# Altium PCB B-60-30-B.PcbDoc (part 3 of 3)
Units mm, origin at the board's own origin, x right, y up, seen from the top; angles counter-clockwise.
Board outline 70.1 x 39.1 mm, 6 copper layers (Top Layer, G1, S1, S2, G2, Bottom Layer), stack 2.011 mm thick; 241 components, 129 nets, 632 pads, 875 vias.
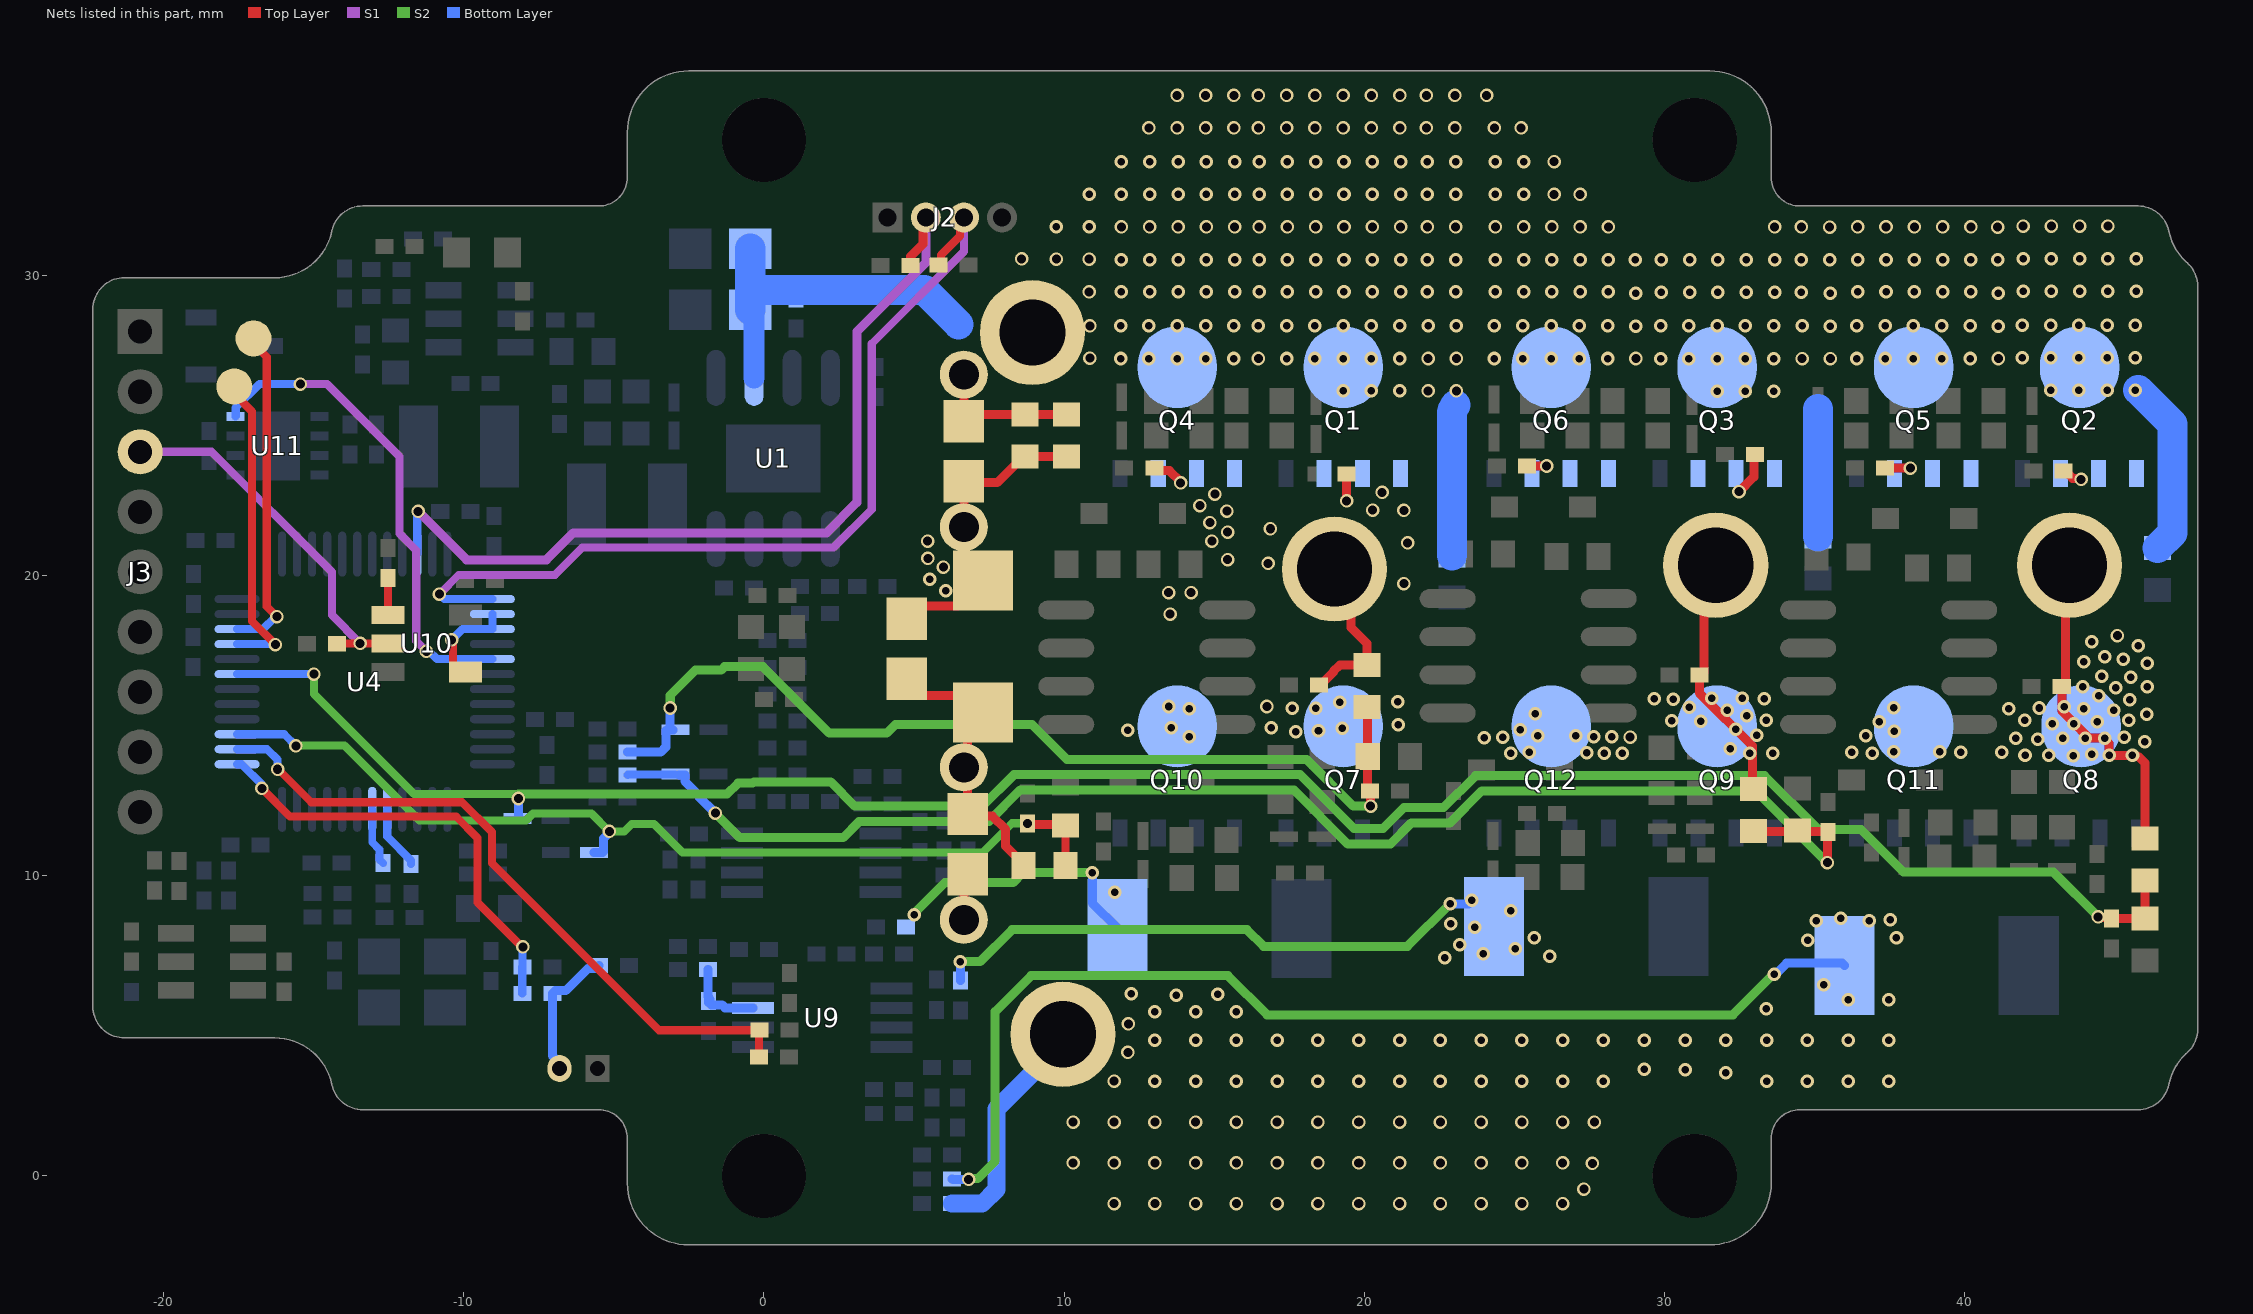
[diagram p7: the nets of this part, all layers, seen from the top]

## Via types
v1: diameter 0.45, hole 0.3, Top Layer to Bottom Layer, 450 vias
v2: diameter 0.45, hole 0.25, Top Layer to Bottom Layer, 425 vias

## Nets (pads, with @x,y where several pads share a name; then routed paths per layer and width w, separated by ;. In a path a pad name is that pad's centre, name@x,y a point inside that pad or via, vN(x,y) a via of type N, cw(c..) or ccw(c..) an arc to the next point about the centre after c; other vN are vias at no path point) (continued)
NetR83_2: R83.2 R89.1 U9.7 | length 2.7
  Bottom Layer w0.3: R89.1@-1.861,6.873 -1.857,6.869 -1.857,5.972 -1.853,5.968 -1.853,5.918 R83.2@-1.802,5.868 ; R83.2@-1.85,5.77 R83.2@-1.85,5.82 -1.85,5.792 -1.75,5.692 -1.392,5.692 -1.291,5.591 -0.36,5.591 U9.7@-0.357,5.588
NetR84_1: R84.1 U10.1 | length 1.2
  Top Layer w0.27: U10.1@-12.528,18.682 -12.52,18.69 R84.1@-12.52,19.91
OSCIN: R43.1 U4.5 | length 2.1
  Bottom Layer w0.27: U4.5@-12.545,12.207 -12.545,11.299 -11.75,10.504 R43.1@-11.75,10.39
OSCOUT: R51.1 U4.6 | length 1.9
  Bottom Layer w0.254: U4.6@-13.045,12.207 -13.045,11.108 -12.803,10.866 -12.803,10.533 R51.1@-12.68,10.41
OUTA: A.1 Q1.3 Q4.3 Q7.1 Q10.1 R19.1 R61.2 R99.2 R105.1 | length 7.6
  Top Layer w0.3: R99.2@13,23.57 13.08,23.49 13.506,23.49 13.877,23.118 v1(13.877,23.078) ; R19.1@18.49,16.35 18.54,16.35 18.968,16.778 18.968,16.798 19.18,17.01 20.03,17.01 R61.2@20.08,17.01 20.08,17.73 19.557,18.253 19.557,19.651 A.1@19,20.208 ; v1(19.41,22.48) R105.1@19.41,23.38 ; v1@20.561,22.79 v1(20.59,22.761)
  other v1: 16.75,15.63 13.53,18.71 13.48,19.42 14.23,19.42 21.31,19.72 16.79,20.4 15.44,20.52 21.44,21.08 14.92,21.14 15.44,21.44 16.87,21.55 14.85,21.75 15.42,22.14 20.27,22.17 21.31,22.16 14.52,22.32 15.02,22.7
  other v2: 14.17,14.62 17.72,14.79 18.47,14.82 12.11,14.84 19.26,14.9 13.56,14.92 16.89,14.93 21.12,15.03 14.17,15.55 17.59,15.57 18.38,15.57 13.48,15.63 19.17,15.77 21.11,15.79
OUTB: B.1 Q3.3 Q6.3 Q9.1 Q12.1 R36.1 R74.2 R101.2 R106.2 | length 10.6
  Top Layer w0.3: R101.2@25.41,23.64 v1(26.07,23.64) ; B.1@31.7,20.335 31.309,19.944 31.309,16.785 31.209,16.685 R36.1@31.159,16.685 31.159,16.078 32.93,14.307 32.93,12.91 R74.2@32.95,12.89 ; v1(32.475,22.783) 32.971,23.279 32.971,23.981 R106.2@33.01,24.02
  other v1: 28.85,14.61
  other v2: 24.88,14.07 27.98,14.07 28.58,14.07 27.4,14.09 32.83,14.08 33.6,14.08 25.49,14.1 32.19,14.23 23.99,14.59 24.6,14.61 27.64,14.63 28.23,14.62 25.77,14.65 27.04,14.66 33.06,14.68 25.19,14.85 32.36,14.88 31.2,15.14 30.23,15.16 33.38,15.18 32.73,15.33 25.69,15.39 32.08,15.51 30.82,15.61 30.29,15.87 29.65,15.89 31.56,15.9 33.31,15.89 32.58,15.91
OUTC: C.1 Q2.3 Q5.3 Q8.1 Q11.1 R53.1 R75.2 R100.2 R107.2 | length 12.8
  Top Layer w0.3: R100.2@37.33,23.58 38.172,23.58 v1(38.185,23.567) ; R107.2@43.28,23.48 43.33,23.48 43.586,23.224 43.839,23.224 v1(43.868,23.195) ; C.1@43.486,20.335 43.355,20.204 43.355,16.404 43.255,16.304 R53.1@43.224,16.304 43.224,15.486 43.64,15.07 v2@44.065,14.645 ; v2(44,14.58) 44.66,14.58 44.66,14.529 44.79,14.4 44.79,14.02 v2(44.81,14) 45.511,14 45.531,13.98 v2@45.56,13.98 ; v2(45.58,14) 45.609,13.971 45.768,13.971 45.99,13.749 R75.2@45.99,11.237
  other v1: 45.08,17.99
  other v2: 43.61,13.99 42,14.01 42.79,14.01 44.23,14.04 36.92,14.07 36.23,14.1 37.63,14.12 39.16,14.12 39.86,14.11 41.22,14.1 45.99,14.45 42.43,14.54 41.69,14.57 43.26,14.57 44.66,14.57 45.3,14.6 36.69,14.65 37.65,14.8 42.9,15.05 43.62,15.05 37.15,15.13 44.41,15.13 41.99,15.18 45.46,15.18 46.06,15.38 44.96,15.51 41.46,15.55 43.96,15.55 37.63,15.59 42.47,15.58 43.3,15.62 45.49,15.85 44.46,15.98 45.03,16.25 43.92,16.28 46.07,16.28 45.52,16.61 44.55,16.64 46.07,17.07 43.95,17.12 45.28,17.2 44.66,17.29 45.772,17.646 44.23,17.78
PG: C4.2 C5.2 C7.1 C8.1 C9.1 C10.2 C11.2 D26.1 R9.2 R70.1 R85.1 R86.1 Rs1.2 Rs2.2 Rs3.2 V-.1 | length 83.3
  Top Layer w0.3: C8.1@4.751,18.557 5.171,18.977 6.441,18.977 D26.1@7.291,19.827 6.656,20.462 C5.2@6.656,21.605 C9.1@6.656,23.129 6.7,23.085 7.77,23.085 8.638,23.953 C10.2@8.688,23.953 C11.2@10.085,23.953 ; C4.2@6.656,8.524 6.656,9.921 C7.1@6.783,10.048
  S2 w0.3: v2(5,8.69) 5,8.731 5.075,8.806 5.075,8.815 6.025,9.765 8.295,9.765 8.624,10.094 v2(10.935,10.094) ; v2(6.54,7.13) 7.196,7.13 8.266,8.2 16.084,8.2 16.646,7.638 21.428,7.638 v2(22.85,9.06) ; v1(6.82,-0.12) 6.849,-0.091 7.119,-0.091 7.7,0.49 7.7,5.47 8.9,6.67 15.45,6.67 16.76,5.36 32.27,5.36 v2@33.62,6.71 ; v2@23.539,9.17 v2(23.58,9.17) ; v2@35.249,6.36 v2(35.29,6.36)
  Bottom Layer w0.3: R85.1@6.27,-0.1 6.29,-0.12 v1(6.82,-0.12) ; R86.1@6.54,6.51 v2(6.54,7.13) ; v2(10.935,10.094) 10.935,9.082 Rs1.2@11.777,8.24 ; v2(22.85,9.06) 23.47,9.06 v2(23.58,9.17) ; v2(33.65,6.71) 33.691,6.71 34.061,7.08 35.913,7.08 Rs2.2@35.993,7
  Bottom Layer w0.6: R9.2@6.27,-0.93 7.27,-0.93 7.75,-0.45 7.75,2.23 V-.1@9.43,3.91
  other v1: 11.66,-0.925 13.018,-0.925 14.377,-0.925 15.735,-0.925 17.094,-0.925 18.452,-0.925 19.811,-0.925 21.169,-0.925 22.527,-0.925 23.886,-0.925 25.244,-0.925 26.603,-0.925 27.31,-0.44 10.302,0.433 11.66,0.433 13.018,0.433 14.377,0.433 15.735,0.433 17.094,0.433 18.452,0.433 19.811,0.433 21.169,0.433 22.527,0.433 23.886,0.433 25.244,0.433 26.603,0.433 27.59,0.41 10.302,1.792 11.66,1.792 13.018,1.792 14.377,1.792 15.735,1.792 17.094,1.792 18.452,1.792 19.811,1.792 21.169,1.792 22.527,1.792 23.886,1.792 25.244,1.792 26.603,1.792 27.66,1.79 11.66,3.15 12.12,4.11 12.14,5.06 5.98,20.27 5.46,20.56 5.45,21.14
  other v2: 13.018,3.15 14.377,3.15 15.735,3.15 17.094,3.15 18.452,3.15 19.811,3.15 21.169,3.15 22.527,3.15 23.886,3.15 25.244,3.15 26.603,3.15 27.961,3.15 33.395,3.15 34.753,3.15 36.112,3.15 37.47,3.15 32.04,3.44 29.32,3.55 30.68,3.54 13.018,4.508 14.377,4.508 15.735,4.508 17.094,4.508 18.452,4.508 19.811,4.508 21.169,4.508 22.527,4.508 23.886,4.508 25.244,4.508 26.603,4.508 27.961,4.508 29.319,4.508 30.678,4.508 32.036,4.508 33.395,4.508 34.753,4.508 36.112,4.508 37.47,4.508 13.018,5.471 14.377,5.471 15.735,5.471 33.39,5.57 36.112,5.867 37.47,5.867 13.74,6.01 12.24,6.07 15.12,6.05 22.68,7.27 26.17,7.31 23.96,7.39 25.02,7.57 23.17,7.7 34.77,7.849 25.65,7.93 37.72,7.93 23.68,8.27 22.87,8.39 35.04,8.49 36.81,8.5 37.51,8.52 35.86,8.57 24.88,8.83 11.69,9.438 6.06,19.48 5.53,19.86
PWM: U4.38 U4.39 U10.4 | length 3.6
  Top Layer w0.27: v1(-10.4,17.85) -10.4,17.801 -10.355,17.756 -10.355,16.995 -10.14,16.78 U10.4@-9.94,16.78 ; U10.4@-9.94,16.63 U10.4@-9.74,16.63
  Bottom Layer w0.27: v1(-10.4,17.85) -10.043,18.207 U4.39@-9.045,18.207 U4.38@-9.045,18.707
PWM-IN: J3.3 R88.1 U10.2 | length 12.7
  Top Layer w0.27: J3.3@-20.776,24.113 J3.3@-20.593,24.113 ; R88.1@-14.22,17.732 v1(-13.45,17.732) U10.2@-12.528,17.732 U10.2@-12.516,17.744
  S1 w0.27: J3.3@-20.776,24.113 -18.393,24.113 -14.39,20.11 -14.39,18.672 v1(-13.45,17.732)
RX3: T2.1 U4.22 | length 11.1
  Top Layer w0.27: T2.1@-17,27.89 -17,27.707 -16.56,27.267 -16.56,18.96 v1(-16.22,18.62)
  Bottom Layer w0.27: U4.22@-17.545,18.207 -16.682,18.207 -16.269,18.62 v1(-16.22,18.62)
STB: U4.41 U11.8 | length 16.2
  S1 w0.27: v1(-15.44,26.37) -14.552,26.37 -12.136,23.954 -12.136,21.386 -11.58,20.83 -11.58,17.81 v1(-11.24,17.47)
  Bottom Layer w0.27: U11.8@-17.601,25.288 -17.59,25.299 -17.59,25.58 -16.8,26.37 v1(-15.44,26.37) ; v1(-11.24,17.47) -11.15,17.47 -10.887,17.207 U4.41@-9.045,17.207
SWC: J2.3 R59.1 U4.37 | length 30.4
  Top Layer w0.27: R59.1@5.73,30.33 5.78,30.33 5.895,30.445 5.895,30.665 6.535,31.305 6.535,31.795 J2.3@6.66,31.92
  S1 w0.27: v1(-10.81,19.37) -10.164,20.016 -6.954,20.016 -6.05,20.92 2.32,20.92 3.59,22.19 3.59,27.71 6.66,30.78 J2.3@6.66,31.92
  Bottom Layer w0.27: v1(-10.81,19.37) -10.647,19.207 U4.37@-9.045,19.207
SWD: J2.2 R55.1 U4.34 | length 29.8
  Top Layer w0.3: R55.1@4.88,30.32 4.88,30.616 5.29,31.026 5.29,31.82 J2.2@5.39,31.92
  S1 w0.3: v1(-11.52,22.13) -9.901,20.511 -7.249,20.511 -6.345,21.415 2.085,21.415 3.095,22.425 3.095,28.115 5.39,30.41 J2.2@5.39,31.92
  Bottom Layer w0.27: U4.34@-11.545,20.707 -11.545,22.105 v1(-11.52,22.13)
Temp-M: J4.2 R63.2 R67.1 | length 4.5
  Bottom Layer w0.3: J4.2@-6.806,3.571 -6.806,3.756 -7.048,3.998 R67.1@-7.048,6.067 -6.948,6.167 -6.601,6.167 -5.858,6.91 -5.59,6.91 R63.2@-5.49,7.01
Temp-MOS: C46.2 R66.2 U4.14 | length 22.9
  Top Layer w0.27: v1(-16.2,13.54) -16.177,13.54 -15.077,12.44 -10.05,12.44 -9.06,11.45 -9.06,10.41 -3.499,4.849 -0.162,4.849 -0.158,4.845 -0.158,3.964 C46.2@-0.162,3.96
  Bottom Layer w0.27: U4.14@-17.545,14.207 -16.548,14.207 -16.2,13.859 v1(-16.2,13.54)
Temp-Motor: C47.2 R67.2 U4.13 | length 14.9
  Top Layer w0.27: v1(-16.72,12.9) -15.78,11.96 -10.249,11.96 -9.54,11.251 -9.54,9.103 -8.063,7.626 v1(-8.03,7.626)
  Bottom Layer w0.27: U4.13@-17.545,13.707 -17.397,13.707 -16.72,13.03 v1(-16.72,12.9) ; R67.2@-8.048,6.067 C47.2@-8.048,6.956 ; C47.2@-8.039,6.956 -8.039,7.617 v1(-8.03,7.626)
TX3: T1.1 U4.21 | length 10.4
  Top Layer w0.27: T1.1@-17.64,26.29 -17.64,26.049 -17.05,25.459 -17.05,18.47 v1(-16.27,17.69)
  Bottom Layer w0.27: U4.21@-17.545,17.707 -16.287,17.707 v1(-16.27,17.69)
V+: C4.1 C5.1 C7.2 C8.2 C9.2 C10.1 C11.1 C12.2 C14.2 C30.1 C32.1 C34.1 D26.2 Q1.1 Q2.1 Q3.1 Q4.1 Q5.1 Q6.1 R5.1 R60.2 U1.2 V+.1 | length 42.5
  Top Layer w0.3: C8.2@4.578,16.73 C8.2@4.751,16.557 4.751,16.527 5.276,16.002 6.716,16.002 D26.2@7.291,15.427 6.783,14.919 C7.2@6.783,12.048 ; C5.1@6.656,26.685 C9.2@6.656,25.129 6.88,25.353 C10.1@8.688,25.353 C11.1@10.085,25.353 ; C7.2@7.308,11.493 6.783,12.018 C7.2@6.783,12.048 ; R60.2@8.646,10.335 8.646,10.385 8.05,10.981 8.05,11.54 7.61,11.98 6.851,11.98 C7.2@6.783,12.048 ; R60.2@8.766,10.635 R60.2@8.816,10.635
  Bottom Layer w0.7: C14.2@-0.456,28.844 -0.329,28.717 U1.2@-0.329,26.574 ; C14.2@-0.456,29.37 C14.2@-0.303,29.217
  Bottom Layer w1: C14.2@-0.456,28.844 -0.456,29.37 C12.2@-0.456,30.876 ; C14.2@-0.06,29.5 5.34,29.5 6.48,28.36 ; C30.1@22.912,20.654 22.912,25.362 cw(c23.346,25.362) 23.039,25.669 ; C34.1@35.104,21.289 35.104,25.542 ; v2@45.772,26.177 46.915,25.034 46.915,21.416 C32.1@46.407,20.908
  other v1: 22.12,26.14 23.062,26.14 10.854,27.23 16.465,27.22 22.12,27.22 23.062,27.22 29.044,27.22 34.575,27.216 35.518,27.216 41.114,27.22 10.854,28.31 10.827,29.437 9.737,30.527 10.827,30.527 8.58,30.54 35.491,31.593 41.087,31.597 11.907,31.607 12.849,31.607 13.792,31.607 14.734,31.607 15.677,31.607 16.492,31.607 17.434,31.607 18.377,31.607 19.319,31.607 20.262,31.607 21.204,31.607 22.093,31.607 23.035,31.607 24.358,31.607 25.301,31.607 26.243,31.607 27.186,31.607 28.128,31.607 33.66,31.603 34.548,31.603 36.428,31.607 37.371,31.607 38.313,31.607 39.256,31.607 40.198,31.607 41.935,31.627 42.878,31.627 43.82,31.627 44.763,31.627 26.32,32.69 27.186,32.687 26.32,33.78 25.22,34.9 12.822,34.904 13.765,34.904 14.707,34.904 15.65,34.904 16.465,34.904 17.407,34.904 18.35,34.904 19.292,34.904 20.235,34.904 21.177,34.904 22.066,34.904 23.008,34.904 24.331,34.904 13.765,35.984 14.707,35.984 15.65,35.984 16.465,35.984 17.407,35.984 18.35,35.984 19.292,35.984 20.235,35.984 21.177,35.984 22.066,35.984 23.008,35.984 24.07,35.98
  other v2: 31.748,26.136 32.69,26.136 33.633,26.136 19.292,26.14 20.235,26.14 21.177,26.14 42.851,26.16 43.793,26.16 44.736,26.16 45.678,26.16 11.88,27.22 12.822,27.22 13.765,27.22 14.707,27.22 15.65,27.22 17.407,27.22 18.35,27.22 19.292,27.22 20.235,27.22 21.177,27.22 24.331,27.22 25.274,27.22 26.216,27.22 27.159,27.22 28.101,27.22 29.863,27.216 30.805,27.216 31.748,27.216 32.69,27.216 33.633,27.216 36.401,27.22 37.344,27.22 38.286,27.22 39.229,27.22 40.171,27.22 41.908,27.24 42.851,27.24 43.793,27.24 44.736,27.24 45.678,27.24 35.518,28.296 11.88,28.31 12.822,28.31 13.765,28.31 14.707,28.31 15.65,28.31 16.465,28.31 17.407,28.31 18.35,28.31 19.292,28.31 20.235,28.31 21.177,28.31 22.12,28.31 23.062,28.31 24.331,28.31 25.274,28.31 26.216,28.31 27.159,28.31 28.101,28.31 29.044,28.3 29.863,28.306 30.805,28.306 31.748,28.306 32.69,28.306 33.633,28.306 34.575,28.306 36.401,28.31 37.344,28.31 38.286,28.31 39.229,28.31 40.171,28.31 41.114,28.3 41.908,28.33 42.851,28.33 43.793,28.33 44.736,28.33 45.678,28.33 35.518,29.386 29.044,29.39 41.114,29.39 11.907,29.437 12.849,29.437 13.792,29.437 14.734,29.437 15.677,29.437 16.492,29.437 17.434,29.437 18.377,29.437 19.319,29.437 20.262,29.437 21.204,29.437 22.093,29.437 23.035,29.437 24.358,29.437 25.301,29.437 26.243,29.437 27.186,29.437 28.128,29.437 29.89,29.433 30.832,29.433 31.775,29.433 32.717,29.433 33.66,29.433 34.548,29.433 36.428,29.437 37.371,29.437 38.313,29.437 39.256,29.437 40.198,29.437 41.935,29.457 42.878,29.457 43.82,29.457 44.763,29.457 45.705,29.457 11.907,30.517 12.849,30.517 13.792,30.517 14.734,30.517 15.677,30.517 16.492,30.517 17.434,30.517 18.377,30.517 19.319,30.517 20.262,30.517 21.204,30.517 22.093,30.517 23.035,30.517 24.358,30.517 25.301,30.517 26.243,30.517 27.186,30.517 28.128,30.517 29.017,30.517 29.89,30.513 30.832,30.513 31.775,30.513 32.717,30.513 33.66,30.513 34.548,30.513 35.491,30.513 36.428,30.517 37.371,30.517 38.313,30.517 39.256,30.517 40.198,30.517 41.087,30.517 41.935,30.537 42.878,30.537 43.82,30.537 44.763,30.537 45.705,30.537 9.737,31.607 10.827,31.607 10.827,32.687 11.907,32.687 12.849,32.687 13.792,32.687 14.734,32.687 15.677,32.687 16.492,32.687 17.434,32.687 18.377,32.687 19.319,32.687 20.262,32.687 21.204,32.687 22.093,32.687 23.035,32.687 24.358,32.687 25.301,32.687 11.907,33.777 12.849,33.777 13.792,33.777 14.734,33.777 15.677,33.777 16.492,33.777 17.434,33.777 18.377,33.777 19.319,33.777 20.262,33.777 21.204,33.777 22.093,33.777 23.035,33.777 24.358,33.777 25.301,33.777
V-A: C44.2 D22.1 R13.2 R61.1 R65.2 | length 32.5
  Top Layer w0.3: R61.1@20.08,15.61 20.11,15.58 R65.2@20.11,13.97 20.11,12.92 20.205,12.825 20.2,12.82 20.2,12.321 v1(20.21,12.311)
  S2 w0.3: v1(-3.128,15.58) -3.12,15.588 -3.12,16 -2.28,16.84 -1.425,16.84 -1.306,16.959 -0.039,16.959 2.18,14.74 4.09,14.74 4.38,15.03 8.93,15.03 10.09,13.87 18.07,13.87 19.629,12.311 v1(20.21,12.311)
  Bottom Layer w0.3: R13.2@-4.536,14.112 -3.438,14.112 -3.262,14.289 -3.262,14.825 -3.232,14.855 D22.1@-3.03,14.855 ; v1(-3.128,15.58) -3.128,14.885 -3.098,14.855 D22.1@-3.09,14.855
V-B: C52.2 D23.1 R21.2 R74.1 R78.2 | length 47.5
  Top Layer w0.3: R74.1@32.95,11.49 32.97,11.47 35.42,11.47 C52.2@35.44,11.45 35.46,11.43 35.42,11.39 v1(35.42,10.43)
  S2 w0.3: v1(-1.62,12.081) -0.804,11.265 2.635,11.265 3.17,11.8 7.49,11.8 8.54,12.85 17.648,12.85 19.448,11.05 20.867,11.05 21.567,11.75 22.841,11.75 23.911,12.82 33.03,12.82 v1(35.42,10.43)
  Bottom Layer w0.27: R21.2@-4.536,13.35 -4.521,13.365 D23.1@-2.965,13.365
  Bottom Layer w0.3: D23.1@-2.826,13.35 -2.635,13.35 -2.635,13.145 -2.18,12.69 -2.18,12.643 v1(-1.62,12.081) v1(-1.62,12.081)
V-BUS: C43.2 D21.1 R60.1 R64.2 U4.15 | length 32.3
  Top Layer w0.27: R64.2@10.046,11.667 10.046,10.584 R60.1@10.05,10.58
  Top Layer w0.3: R64.2@10.046,11.667 10.009,11.703 C43.2@8.813,11.703 ; C43.2@8.813,11.703 v1(8.776,11.74) C43.2@8.813,11.703
  S2 w0.27: v1(-15.59,14.32) -15.576,14.334 -13.974,14.334 -11.47,11.83 -7.926,11.83 -7.691,12.065 -5.745,12.065 v1(-5.15,11.47) -4.652,11.47 -4.402,11.72 -3.66,11.72 -2.71,10.77 7.289,10.77 8.26,11.74 v1(8.776,11.74)
  Bottom Layer w0.27: U4.15@-17.545,14.707 -15.977,14.707 v1(-15.59,14.32)
  Bottom Layer w0.3: D21.1@-5.655,10.772 -5.37,10.772 -5.348,10.794 -5.348,11.231 -5.15,11.429 v1(-5.15,11.47)
V-C: C53.2 D24.1 R75.1 R79.2 U4.19 | length 72.1
  Top Layer w0.3: v1(44.439,8.62) 44.464,8.595 44.855,8.595 C53.2@44.88,8.57 ; C53.2@44.88,8.57 R79.2@45.99,8.57 R75.1@45.99,9.837
  S2 w0.27: v1(-14.99,16.71) -14.99,16.05 -11.65,12.71 v1@-8.18,12.71
  S2 w0.3: v1(-8.18,12.566) -8.18,12.71 -1.232,12.71 -0.862,13.08 -0.378,13.08 -0.338,13.12 2.219,13.12 3.029,12.31 7.279,12.31 8.329,13.36 17.859,13.36 19.659,11.56 20.614,11.56 21.314,12.26 22.63,12.26 23.7,13.33 33.32,13.33 35.11,11.54 36.53,11.54 37.96,10.11 42.949,10.11 v1(44.439,8.62)
  Bottom Layer w0.27: U4.19@-17.545,16.707 -16.005,16.707 -15.998,16.714 -14.994,16.714 v1(-14.99,16.71)
  Bottom Layer w0.3: D24.1@-8.21,11.9 -8.18,11.93 v1(-8.18,12.566)
pads on no net: U1.6 U4.2 U4.3 U4.4 U4.25 U4.32 U4.33 U4.42 U4.43 U11.5 U11.9 U12.4

## Polygon pours and split planes (outlines as drawn)
GND on Bottom Layer "GND_L06_P111" (solid, pour order 111): 30 vertices, not listed, extent -21.85,2.9 4.12,32.16
PG on Bottom Layer "PG_L06_P114" (solid, pour order 114): 17 vertices, not listed, extent 5.16,8.02 11.327,22.71
CA on Bottom Layer "CA_L06_P119" (solid, pour order 119): 22 vertices, not listed, extent 12.63,6.61 22.59,12.6
CB on Bottom Layer "Bottom Layer-CB" (solid, pour order 71): 22 vertices, not listed, extent 24.949,6.629 35.079,12.632
V+ on Bottom Layer "Bottom Layer-V+" (solid, pour order 28): 21 vertices, not listed, extent 5.513,24.78 47.042,32.733
3V3 on Bottom Layer "3V3_L06_P108" (solid, pour order 108): -11,10.95 -11.2,10.75 -11.2,9.27 -10.57,8.64 -10.119,8.64 -9.854,8.905 -9.854,10.76 -10.044,10.95
GND on Bottom Layer "GND_L06_P106" (solid, pour order 106): 5.259,-0.941 4.368,-0.05 3.85,-0.05 3.47,-0.43 3.47,-1.57 3.77,-1.87 5.83,-1.87 6,-1.7 6,-1.48 5.461,-0.941
AGND on Bottom Layer "AGND_L06_P099" (solid, pour order 99): 2.29,14.74 3.71,14.74 5,13.45 5,3.93 4.33,3.26 -1.594,3.26 -2.114,2.74 -6.92,2.74 -7.44,3.26 -7.44,6.45 -7.44,7.89 -1.86,13.47 1.02,13.47 2.25,14.7
PG on Bottom Layer "Bottom Layer-PG" (solid, pour order 20): 36 vertices, not listed, extent 7.97,-1.086 38.56,9.51
V+ on Bottom Layer "Bottom Layer-V+ 1" (solid, pour order 86): 8.69,30.73 13.24,36.36 24.63,36.36 30.26,30.73
CC on Bottom Layer "Bottom Layer-CC" (solid, pour order 30): 55 vertices, not listed, extent 37,4.587 47.56,19.98
OUTC on Bottom Layer "Bottom Layer-OUTC" (solid, pour order 26): 17 vertices, not listed, extent 35.495,13.096 46.28,24.145
OUTB on Bottom Layer "Bottom Layer-OUTB" (solid, remove dead copper, pour order 24): 34.093,24.145 cw(c34.093,23.764) 34.474,23.764 34.474,13.731 cw(c33.447,14.044) 33.951,13.096 24.014,13.096 cw(c25.436,14.518) 23.425,14.518 23.425,19.664 cw(c25.965,19.664) 24.169,21.46 24.822,22.113 ccw(c24.209,22.726) 25.076,22.726 25.076,23.701 cw(c25.518,23.609) 25.266,23.983 cw(c25.724,23.424) 25.775,24.145
OUTA on Bottom Layer "Bottom Layer-OUTA" (solid, pour order 22): 21.642,24.145 cw(c21.642,23.764) 22.023,23.764 22.023,13.731 cw(c20.995,14.045) 21.5,13.096 11.563,13.096 cw(c12.985,14.518) 10.974,14.518 10.974,19.664 cw(c13.514,19.664) 11.718,21.46 12.371,22.113 ccw(c11.758,22.726) 12.625,22.726 12.625,23.711 cw(c13.059,23.711) 12.752,24.018 cw(c13.059,23.711) 13.059,24.145
CA on Top Layer "CA_L01_P135" (solid, pour order 135): 19.91,11.55 22,11.55 22.34,11.21 22.34,9.98 21.16,8.8 21.16,6.89 20.96,6.69 17.5,6.69 17.23,6.96 17.23,8.96 18.35,10.08
CB on Top Layer "CB_L01_P134" (solid, pour order 134): 25 vertices, not listed, extent 26.38,7.08 34.51,12.55
CC on Top Layer "CC_L01_P133" (solid, pour order 133): 20 vertices, not listed, extent 38.77,4.28 46.67,9.6
OUTA on Top Layer "OUTA_L01_P132" (solid, pour order 132): 21 vertices, not listed, extent 16.64,14.71 22.08,22.93
OUTB on Top Layer "OUTB_L01_P131" (solid, pour order 131): 26 vertices, not listed, extent 29.35,13.6 33.84,22.04
OUTC on Top Layer "OUTC_L01_P130" (solid, pour order 130): 42.96,22.19 45.17,22.19 47.1,20.26 47.1,14.8 46.06,13.76 41.46,13.76 41.46,15.66 42.55,15.66 43.11,16.22 43.11,16.73 42.07,17.77 42.07,19.53 41.57,20.03 41.57,21.48 42.24,22.15
PG on Top Layer "PG_L01_P122" (solid, pour order 122): 43 vertices, not listed, extent 5.65,-1.57 38.31,10.048
GND on Top Layer "GND_L01_P110" (solid, pour order 110): 30 vertices, not listed, extent -21.85,2.9 4.12,32.16
GND on Top Layer "GND_L01_P107" (solid, pour order 107): 3.48,1.98 3.48,-1.58 3.99,-2.09 5.94,-2.09 6.31,-1.72 6.31,-1.02 5.13,0.16 5.13,2.55 3.19,4.49 1.949,4.49 1.459,4.001 1.631,3.829
AGND on Top Layer "AGND_L01_P104" (solid, pour order 104): 0.94,16.88 2.86,14.96 3.51,14.96 4.44,14.03 4.44,13.37 3.41,12.34 3.41,5.49 1.55,3.63 -1.14,3.63 -1.95,2.82 -6.01,2.82 -7.38,4.19 -7.38,7.91 0.57,15.86 0.57,16.91
V+ on Top Layer "V+_L01_P102" (solid, pour order 102): 67 vertices, not listed, extent 5.04,24.39 47.58,34.18
V+ on Top Layer "Top Layer-V+ 1" (solid, pour order 88): 6.45,28.86 13.88,36.29 24.21,36.29 31.64,28.86
PG on Top Layer "Top Layer-PG 1" (solid, pour order 36): 19 vertices, not listed, extent 4.11,17.99 8.66,23.836
PG on S1 "PG_L03_P103" (solid, pour order 103): 36 vertices, not listed, extent 3.76,-1.6 38.03,22.85
CA on S1 "CA_L03_P121" (solid, pour order 121): 17.27,6.69 17.82,6.14 21.11,6.14 21.72,6.75 21.72,9.242 22.091,9.614 17.574,9.614 17.27,9.31
CC on S1 "S1-CC" (solid, pour order 76): 28 vertices, not listed, extent 37.06,4.57 47.43,12.31
CA on S1 "CA_L03_P118" (solid, pour order 118): 21 vertices, not listed, extent 12.47,8.22 22.493,12.62
CB on S1 "CB_L03_P116" (solid, pour order 116): 24 vertices, not listed, extent 26.25,6.97 34.5,12.6
GND on S1 "GND_L03_P113" (solid, pour order 113): 28 vertices, not listed, extent -21.77,-1.8 6.9,32.17
V+ on S1 "S1-V+" (solid, pour order 98): 22 vertices, not listed, extent 5.32,12.7 47.27,36.28
OUTC on S1 "S1-OUTC" (solid, pour order 66): 37.436,24.217 45.956,24.217 cw(c45.956,23.637) 46.366,24.047 cw(c46.028,23.709) 46.506,23.709 46.506,14.026 cw(c45.857,14.026) 46.316,13.567 46.044,13.295 cw(c45.856,13.483) 45.856,13.217 36.006,13.217 cw(c36.006,13.627) 35.716,13.337 cw(c36.32,13.941) 35.466,13.941 35.466,22.308 cw(c37.515,22.308) 36.066,23.757 cw(c37.225,22.598) 37.225,24.237 37.436,24.237
OUTB on S1 "S1-OUTB" (solid, pour order 64): 25.65,24.217 34.17,24.217 cw(c34.17,23.637) 34.58,24.047 cw(c34.242,23.709) 34.72,23.709 34.72,14.026 cw(c34.071,14.026) 34.53,13.567 34.258,13.295 cw(c34.07,13.483) 34.07,13.217 24.22,13.217 cw(c24.22,13.627) 23.93,13.337 cw(c24.534,13.941) 23.68,13.941 23.68,22.308 cw(c25.729,22.308) 24.28,23.757 cw(c25.439,22.598) 25.439,24.237 25.65,24.237
OUTA on S1 "S1-OUTA" (solid, pour order 62): 12.95,24.09 21.47,24.09 cw(c21.47,23.51) 21.88,23.92 cw(c21.542,23.582) 22.02,23.582 22.02,13.899 cw(c21.371,13.899) 21.83,13.44 21.558,13.168 cw(c21.37,13.356) 21.37,13.09 11.52,13.09 cw(c11.52,13.5) 11.23,13.21 cw(c11.834,13.814) 10.98,13.814 10.98,22.181 cw(c13.029,22.181) 11.58,23.63 cw(c12.739,22.471) 12.739,24.11 12.95,24.11
OUTA on S2 "OUTA_L04_P129" (solid, pour order 129): 13.785,23.395 20.665,23.395 21.86,22.2 21.86,19.73 21.165,19.035 20.865,19.035 20.315,18.485 13.375,18.485 12.985,18.875 12.985,20.905 13.455,21.375 13.455,23.065
PG on S2 "PG_L04_P128" (solid, pour order 128): 5.53,22.55 7.48,22.55 8.98,21.05 8.98,19.71 8.43,19.16 5.1,19.16 4.42,19.84 4.42,21.44
PG on S2 "PG_L04_P127" (solid, pour order 127): 17 vertices, not listed, extent 8.18,-1.57 37.98,6.75
OUTC on S2 "OUTC_L04_P126" (solid, pour order 126): 42.67,22.35 45.06,22.35 46.78,20.63 46.78,14.36 45.95,13.53 45.9,13.58 36.249,13.58 35.85,13.979 35.85,15.53
OUTB on S2 "OUTB_L04_P125" (solid, pour order 125): 24.33,16.16 33.51,16.16 34.32,15.35 34.32,14.1 33.98,13.76 24.15,13.76 23.54,14.37 23.54,15.37
OUTA on S2 "OUTA_L04_P124" (solid, pour order 124): 12.21,16.18 21.39,16.18 22.02,15.55 22.02,14.5 21.61,14.09 18.65,14.09 18.38,14.36 11.89,14.36 11.54,14.71 11.54,15.51
V+ on S2 "V+_L04_P123" (solid, pour order 123): 17 vertices, not listed, extent 5.52,24.88 46.83,36.18
CC on S2 "S1-CC" (solid, pour order 120): 25 vertices, not listed, extent 37.06,4.57 47.43,12.31
CA on S2 "CA_L04_P117" (solid, pour order 117): 21 vertices, not listed, extent 12.47,8.22 22.493,12.62
CB on S2 "CB_L04_P115" (solid, pour order 115): 24 vertices, not listed, extent 26.25,6.97 34.5,12.6
GND on S2 "GND_L04_P105" (solid, remove dead copper, pour order 105): 28 vertices, not listed, extent -21.77,-1.8 6.9,32.17
AGND on G1 (split plane): 57 vertices, not listed, extent -7.538,-1.791 7.038,15.318
PG on G1 (split plane): 118 vertices, not listed, extent 5.882,-1.791 47.24,9.618
GND on G1 (split plane): 168 vertices, not listed, extent -21.841,2.709 4.878,36.291
V+ on G1 (split plane): 100 vertices, not listed, extent 5.882,10.622 47.24,36.291
no net on G1 (split plane): 47.04,4.46
OUTC on G1 (split plane): 47.24,10.622 37.399,10.622 37.398,10.623 37.3,10.632 35.998,10.632 36.002,10.68 36.002,23.058 47.24,23.058
OUTA on G1 (split plane): 22.238,10.622 13.962,10.622 13.962,18.802 18.218,23.058 22.238,23.058
OUTB on G1 (split plane): 34.998,10.68 35.003,10.622 23.242,10.622 23.242,23.058 34.998,23.058
GND on G2 (split plane): 210 vertices, not listed, extent -21.841,-1.791 7.078,36.291
V+ on G2 (split plane): 97 vertices, not listed, extent 5.882,10.482 47.24,36.291
PG on G2 (split plane): 131 vertices, not listed, extent 5.882,-1.791 47.24,9.478
OUTB on G2 (split plane): 35.928,10.512 35.21,10.512 35.112,10.503 35.045,10.482 24.862,10.482 24.862,23.058 35.928,23.058
no net on G2 (split plane): 47.04,4.46
OUTA on G2 (split plane): 23.858,10.482 11.172,10.482 11.172,22.702 11.528,23.058 23.858,23.058
OUTC on G2 (split plane): 47.24,10.482 36.932,10.482 36.932,23.058 47.24,23.058

## Other copper
Top Layer:
  rectangle net GND: 24.02,20.245 25.11,21.56
S2:
  rectangle net GND: -1.23,22.73 2.12,25.14
Bottom Layer:
  rectangle net CC: 38.88,6.71 40.445,7.704
G1 (plane layer: these items are gaps in the copper):
  rectangle: -13.94,31.25 -13.87,31.51
  rectangle: 3.17,15.93 3.87,17.17
  lines w1: -8.04,2.21 -8.04,8.44 -0.66,15.82 5.38,15.82 ; 5.37,10.12 13.46,10.12 ; 5.38,10.12 5.38,7.64 ; 5.38,36.8 5.38,7.64 ; 7.54,-2.11 7.54,5.48 ; 22.74,10.28 22.74,23.55 ; 33.65,6.71 33.65,8.44 35.34,10.13 37.3,10.13 ; 35.5,10.68 35.5,23.55 ; 47.62,10.12 13.46,10.12 ; 47.8,23.56 18.01,23.56 13.46,19.01 13.46,10.12 ; 5.38,7.64 7.54,5.48 ; 5.38,7.64 7.54,5.48
  lines w1.016: -14.39,31.463 cw(c-14.341,31.453) -14.39,31.463 ; -14.39,31.463 ccw(c-16.3,31.861) -14.39,31.463 ; -14.39,31.463 cw(c-16.3,31.861) -16.3,29.91 -21.3,29.91 ccw(c-21.3,28.86) -22.35,28.86 -22.35,5.644 ccw(c-21.3,5.644) -21.3,4.593 -16.3,4.593 cw(c-16.3,2.642) -14.39,3.041 ccw(c-14.341,3.051) -14.388,3.032 ; -14.39,31.463 -14.39,31.463 ; -14.39,31.463 -14.39,31.463 ; -14.39,31.463 cw(c-13.363,31.251) -13.362,32.3 -5.504,32.3 cw(c-5.5,32.25) -5.5,32.3 ccw(c-5.5,33.25) -4.55,33.25 -4.55,34.75 cw(c-2.5,34.75) -2.5,36.8 ; -14.39,31.463 -14.39,31.463 ; -14.388,3.032 ccw(c-13.362,3.248) -13.36,2.199 ccw(c-13.36,2.25) -13.356,2.2 -5.5,2.2 cw(c-5.5,1.25) -4.55,1.25 -4.55,-0.25 ccw(c-2.5,-0.25) -2.5,-2.3 ; -14.388,3.032 -14.388,3.032 ; -2.5,-2.3 ccw(c-2.5,-2.25) -2.499,-2.3 ; -2.499,-2.3 31.5,-2.3 ccw(c31.5,-0.25) 33.55,-0.25 33.55,1.25 cw(c34.5,1.25) 34.5,2.2 45.756,2.2 ccw(c45.76,2.25) 45.76,2.199 ccw(c45.762,3.248) 46.789,3.04 ; -2.499,36.8 ccw(c-2.5,36.75) -2.5,36.8 ; -2.499,36.8 31.5,36.8 cw(c31.5,34.75) 33.55,34.75 33.55,33.25 ccw(c34.5,33.25) 34.5,32.3 45.762,32.3 cw(c45.762,32.25) 45.766,32.3 cw(c45.763,31.251) 46.79,31.463 ; 46.789,3.04 cw(c48.7,2.649) 47.353,4.059 ccw(c47.328,4.103) 47.36,4.064 ccw(c46.7,4.88) 47.749,4.87 ccw(c47.7,4.88) 47.75,4.88 47.75,29.628 ccw(c47.7,29.628) 47.749,29.638 ccw(c46.7,29.628) 47.36,30.444 ; 46.789,3.04 46.789,3.04 ; 46.79,31.463 ccw(c48.7,31.861) 47.358,30.445 ; 46.79,31.463 46.79,31.463 ; 47.358,30.445 cw(c47.328,30.405) 47.36,30.444 ; 47.358,30.445 47.358,30.445 ; 47.36,30.444 47.36,30.444
G2 (plane layer: these items are gaps in the copper):
  rectangle: -1.81,14.55 -1.02,15.43
  rectangle: -13.96,31.17 -13.8,31.6
  lines w1: 5.38,36.55 5.38,7.85 7.58,5.65 ; 5.39,7.13 6.54,7.13 ; 5.42,9.98 47.39,9.98 ; 5.47,7.76 7.58,5.65 ; 7.58,-2.12 7.58,5.65 ; 10.67,10.24 10.67,22.91 11.32,23.56 47.59,23.56 ; 24.36,10.18 24.36,23.46 ; 33.65,6.71 33.65,8.45 35.21,10.01 36.35,10.01 ; 36.43,10.37 36.43,23.5
  lines w1.016: -14.39,31.463 cw(c-14.341,31.453) -14.39,31.463 ; -14.39,31.463 ccw(c-16.3,31.861) -14.39,31.463 ; -14.39,31.463 cw(c-16.3,31.861) -16.3,29.91 -21.3,29.91 ccw(c-21.3,28.86) -22.35,28.86 -22.35,5.644 ccw(c-21.3,5.644) -21.3,4.593 -16.3,4.593 cw(c-16.3,2.642) -14.39,3.041 ccw(c-14.341,3.051) -14.388,3.032 ; -14.39,31.463 -14.39,31.463 ; -14.39,31.463 -14.39,31.463 ; -14.39,31.463 cw(c-13.363,31.251) -13.362,32.3 -5.504,32.3 cw(c-5.5,32.25) -5.5,32.3 ccw(c-5.5,33.25) -4.55,33.25 -4.55,34.75 cw(c-2.5,34.75) -2.5,36.8 ; -14.39,31.463 -14.39,31.463 ; -14.388,3.032 ccw(c-13.362,3.248) -13.36,2.199 ccw(c-13.36,2.25) -13.356,2.2 -5.5,2.2 cw(c-5.5,1.25) -4.55,1.25 -4.55,-0.25 ccw(c-2.5,-0.25) -2.5,-2.3 ; -14.388,3.032 -14.388,3.032 ; -2.5,-2.3 ccw(c-2.5,-2.25) -2.499,-2.3 ; -2.499,-2.3 31.5,-2.3 ccw(c31.5,-0.25) 33.55,-0.25 33.55,1.25 cw(c34.5,1.25) 34.5,2.2 45.756,2.2 ccw(c45.76,2.25) 45.76,2.199 ccw(c45.762,3.248) 46.789,3.04 ; -2.499,36.8 ccw(c-2.5,36.75) -2.5,36.8 ; -2.499,36.8 31.5,36.8 cw(c31.5,34.75) 33.55,34.75 33.55,33.25 ccw(c34.5,33.25) 34.5,32.3 45.762,32.3 cw(c45.762,32.25) 45.766,32.3 cw(c45.763,31.251) 46.79,31.463 ; 46.789,3.04 cw(c48.7,2.649) 47.353,4.059 ccw(c47.328,4.103) 47.36,4.064 ccw(c46.7,4.88) 47.749,4.87 ccw(c47.7,4.88) 47.75,4.88 47.75,29.628 ccw(c47.7,29.628) 47.749,29.638 ccw(c46.7,29.628) 47.36,30.444 ; 46.789,3.04 46.789,3.04 ; 46.79,31.463 ccw(c48.7,31.861) 47.358,30.445 ; 46.79,31.463 46.79,31.463 ; 47.358,30.445 cw(c47.328,30.405) 47.36,30.444 ; 47.358,30.445 47.358,30.445 ; 47.36,30.444 47.36,30.444

## Silkscreen, mask and mechanical layers (free items; w line width, h text height)
Top Overlay:
  circle w0.254: c31,0 r3
  circle w0.254: c0,0 r3
  circle w0.254: c0,34.5 r3
  circle w0.254: c31,34.5 r3
  lines w0.15: 2.58,32.06 3.48,32.96 3.48,36.32 9.31,36.32 9.31,33.11 3.48,33.11 ; 5,33.11 5,36.26 ; 6.42,33.13 6.42,36.28 ; 7.84,33.14 7.84,36.29
  lines w0.254: -7.467,2.963 -7.69,2.74 -13.7,2.74 -13.7,4.51 -7.745,4.51 -7.441,4.206
  text "VCC" at 4.74,33.43 h0.9 r90
  text "SWD" at 6.163,33.43 h0.9 r90
  text "SWC" at 7.587,33.43 h0.9 r90
  text "GND" at 9.01,33.43 h0.9 r90
  text "H" at -19.252,27.701 h0.9
  text "L" at -19.252,25.701 h0.9
  text "PWM" at -19.26,23.63 h0.9
  text "GND" at -19.252,21.701 h0.9
  text "12V" at -19.252,19.701 h0.9
  text "GND" at -19.252,17.701 h0.9
  text "HA" at -19.252,15.701 h0.9
  text "HB" at -19.252,13.701 h0.9
  text "HC" at -19.252,11.701 h0.9
  text "电机温度" at -13.42,2.95 h1.5
Top Solder:
  rectangle: 11.69,27.49 45.1,31.33
  rectangle: 12.55,2.81 38.23,6.28
  lines w1.5: 10.43,31.62 12.21,33.4 25.11,33.4 ; 11.22,2.3 12.51,1.01 26.28,1.01
Bottom Solder:
  lines w1.5: 11.33,31.12 44.25,31.12 ; 12.06,1.37 26.06,1.37 ; 12.29,33.7 25.93,33.7 ; 13.21,4.31 33.73,4.31
Mechanical 1:
  lines w0.013: -15.3,4.382 cw(c-16.3,2.649) -14.34,3.05
  lines w0.1: -14.341,3.051 ccw(c-16.3,2.642) -16.3,4.644 -21.3,4.644 cw(c-21.3,5.644) -22.3,5.644 -22.3,28.86 cw(c-21.3,28.86) -21.3,29.86 -16.3,29.86 ccw(c-16.3,31.861) -14.341,31.453 cw(c-13.363,31.251) -13.362,32.25 -5.5,32.25 ; -14.34,3.05 ccw(c-13.362,3.248) -13.36,2.25 -5.5,2.25 cw(c-5.5,1.25) -4.5,1.25 -4.5,-0.25 ccw(c-2.5,-0.25) -2.5,-2.25 31.5,-2.25 ccw(c31.5,-0.25) 33.5,-0.25 33.5,1.25 cw(c34.5,1.25) 34.5,2.25 45.76,2.25 ccw(c45.762,3.248) 46.74,3.05 cw(c48.7,2.649) 47.416,4.183 ; -5.5,32.25 ccw(c-5.5,33.25) -4.5,33.25 -4.5,34.75 cw(c-2.5,34.75) -2.5,36.75 31.5,36.75 cw(c31.5,34.75) 33.5,34.75 33.5,33.25 ccw(c34.5,33.25) 34.5,32.25 45.762,32.25 cw(c45.763,31.251) 46.741,31.453 ccw(c48.7,31.861) 47.328,30.405 cw(c46.7,29.628) 47.699,29.628 47.7,4.88 cw(c46.7,4.88) 47.328,4.103
Mechanical 2:
  lines w0.1: -27.3,17.25 49.57,17.25